# Altium PCB OmniCore_SDR.PcbDoc (part 6 of 14)
Units mil, origin at the board's own origin, x right, y up, seen from the top; angles counter-clockwise.
Board outline 4724.72 x 2755.91 mil, 8 copper layers (Top, GND 1, Layer 1, Layer 2, GND 2, Layer 3, Power, Bottom), stack 40.468 mil thick; 534 components, 427 nets, 2325 pads, 1892 vias.
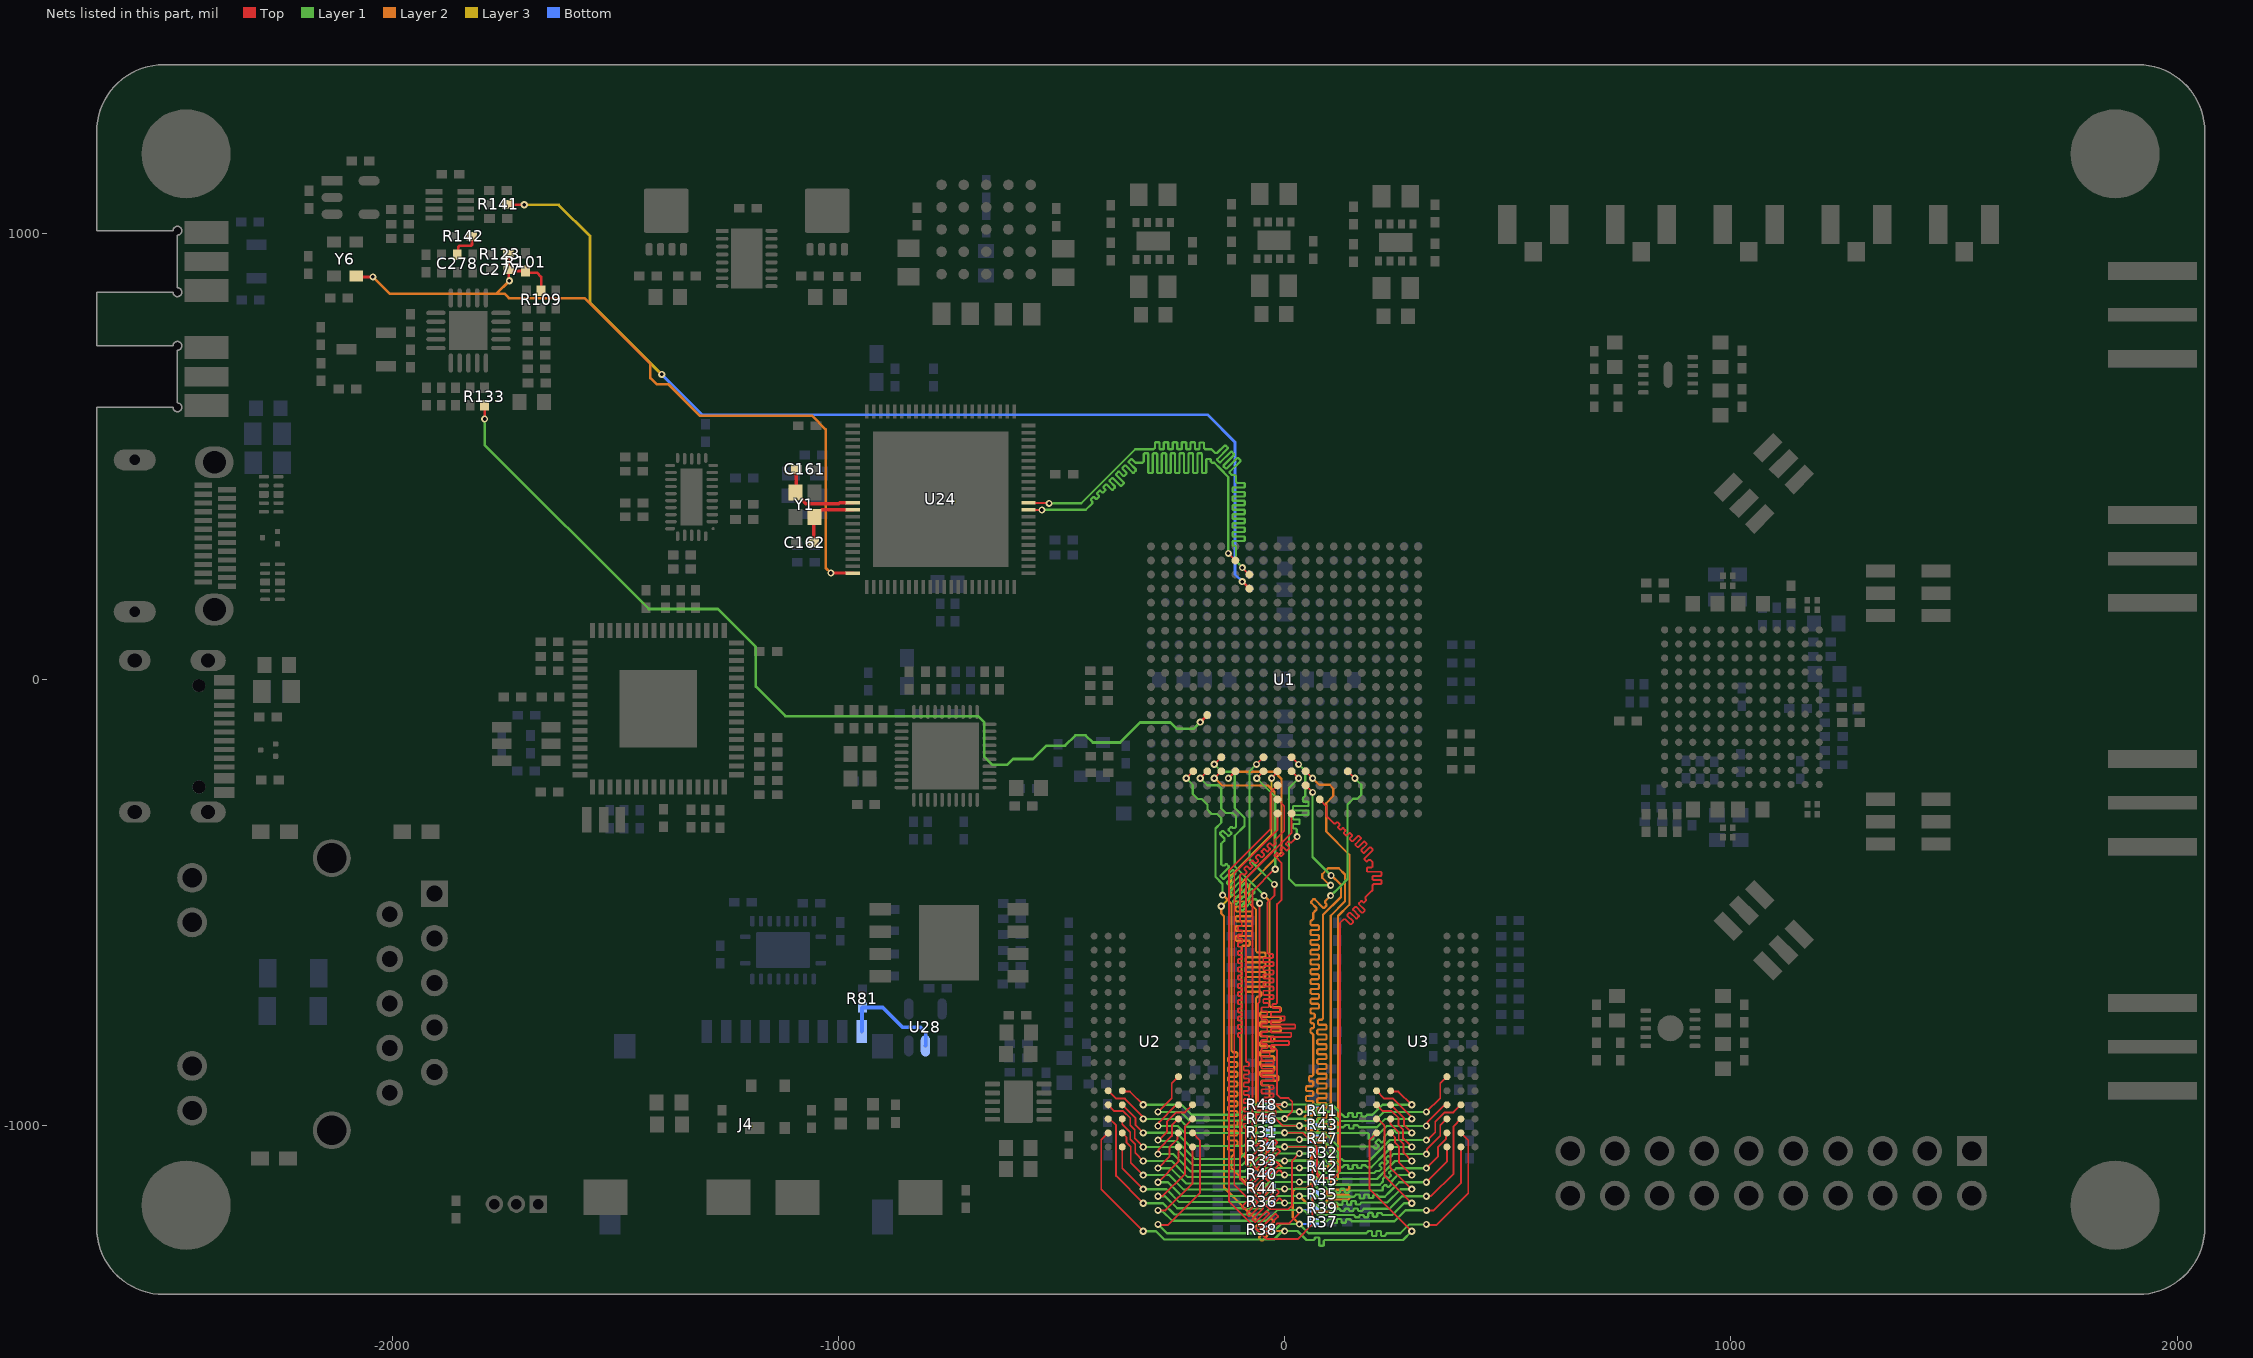
[diagram p11: the nets of this part, all layers, seen from the top]

## Via types
v1: diameter 16, hole 8, Top to Bottom, tented both sides, 1844 vias
v2: diameter 19.68, hole 7.87, Top to Bottom, 44 vias
v3: diameter 200, hole 125, Top to Bottom, 4 vias

## Nets (pads, with @x,y where several pads share a name; then routed paths per layer and width w, separated by ;. In a path a pad name is that pad's centre, name@x,y a point inside that pad or via, vN(x,y) a via of type N, cw(c..) or ccw(c..) an arc to the next point about the centre after c; other vN are vias at no path point) (continued)
ADF4001_LE: R133.1 U1.E8 | length 2173.8
  Top w6: R133.1@-1793.35,614.66 -1793,614.32 v1(-1793,584) ; v1(-189.22,-95.28) U1.E8@-173.47,-79.53
  Layer 1 w6: v1(-1793,584) -1793,526 -1425,158 -1270,158 -1185,73 -1185,-16 -1119,-82 -687,-82 -673,-96 -673,-173 -655,-191 -622,-191 -609,-178 -564,-178 -534,-148 -492,-148 -469,-125 -446,-125 -430,-141 -368.85,-141 -323.85,-96 -256,-96 -241.72,-110.28 -204.22,-110.28 v1(-189.22,-95.28)
ADF4001_PLL_REF: C278.1 R142.2 | length 70.1
  Top w6: C278.1@-1854.35,952.03 -1852,954.38 -1852,969.54 -1849.54,972 -1823.81,972 -1821.35,974.46 R142.2@-1821.35,993.35
BOOT: J4.9 R81.1 U28.2 | length 249.6
  Bottom w8: J4.9@-948.22,-788.58 -947.21,-787.56 -947.21,-735.8 R81.1@-946.2,-734.78 -900.64,-734.78 -855.92,-779.5 -816.2,-779.5 -804.5,-791.2 -804.5,-820.3 U28.2@-805.1,-820.9
CH32H417_RX: U1.H18 U24.55 | length 1508.3
  Top w4.2: U24.55@-574.2,396.1 -573.65,395.55 -528.55,395.55 v1(-528,395) ; v1(-94.73,251.07) v1(-94.73,251.07) U1.H18@-78.98,235.43 U1.H18@-78.98,235.43
  Layer 1 w5: v1(-528,395) -456,395 -335,516 -296.22,516 -293.72,516 -290.79,518.93 -290.79,530.5 -289.29,532 -282.29,532 -280.79,530.5 -280.79,517.5 -279.29,516 -272.29,516 -270.79,517.5 -270.79,530.5 -269.29,532 -262.29,532 -260.79,530.5 -260.79,517.5 -259.29,516 -252.29,516 -250.79,517.5 -250.79,530.5 -249.29,532 -242.29,532 -240.79,530.5 -240.79,517.5 -239.29,516 -232.29,516 -230.79,517.5 -230.79,530.5 -229.29,532 -222.29,532 -220.79,530.5 -220.79,517.5 -219.29,516 -212.29,516 -210.79,517.5 -210.79,530.5 -209.29,532 -202.29,532 -200.79,530.5 -200.79,517.5 -199.29,516 -192.29,516 -190.79,517.5 -190.79,530.05 -189.29,531.55 -182.29,531.55 -180.79,530.05 -180.79,518.93 -177.87,516 -172,516 -164,516 -157.5,509.5 -155.73,507.73 -151.59,507.73 -134.59,524.74 -132.46,524.74 -127.51,519.79 -127.51,517.67 -151.17,494.01 -151.17,491.89 -146.22,486.94 -144.09,486.94 -120.44,510.59 -118.32,510.59 -113.37,505.64 -113.37,503.52 -137.02,479.87 -137.02,477.75 -132.07,472.8 -129.95,472.8 -106.3,496.45 -104.18,496.45 -99.23,491.5 -99.23,489.38 -122.88,465.73 -122.88,463.61 -117.93,458.66 -112.16,458.66 -109.23,455.73 -109.23,449.81 -109.23,446 -109.23,443.5 -106.3,440.57 -90.73,440.57 -89.23,439.07 -89.23,432.07 -90.73,430.57 -115.73,430.57 -117.23,429.07 -117.23,422.07 -115.73,420.57 -90.73,420.57 -89.23,419.07 -89.23,412.07 -90.73,410.57 -115.73,410.57 -117.23,409.07 -117.23,402.07 -115.73,400.57 -90.73,400.57 -89.23,399.07 -89.23,392.07 -90.73,390.57 -115.73,390.57 -117.23,389.07 -117.23,382.07 -115.73,380.57 -90.73,380.57 -89.23,379.07 -89.23,372.07 -90.73,370.57 -115.73,370.57 -117.23,369.07 -117.23,362.07 -115.73,360.57 -90.73,360.57 -89.23,359.07 -89.23,352.07 -90.73,350.57 -115.73,350.57 -117.23,349.07 -117.23,342.07 -115.73,340.57 -90.73,340.57 -89.23,339.07 -89.23,332.07 -90.73,330.57 -115.73,330.57 -117.23,329.07 -117.23,322.07 -115.73,320.57 -90.73,320.57 -89.23,319.07 -89.23,312.07 -90.73,310.57 -115.73,310.57 -117.23,309.07 -117.23,302.07 -115.73,300.57 -112.16,300.57 -109.23,297.64 -109.23,291 -109.23,265.68 -94.73,251.18 v1(-94.73,251.07)
CH32H417_TX: U1.G19 U24.54 | length 1508.1
  Top w4.2: U24.54@-574.2,380.4 -574,380.2 -544.2,380.2 v1(-544,380) ; v1(-126.23,282.68) U1.G19@-110.48,266.93
  Layer 1 w5: v1(-544,380) -543.5,380.5 -445.5,380.5 -433,393 -431.23,394.77 -431.23,398.91 -434.24,401.91 -434.24,404.04 -429.29,408.99 -427.17,408.99 -422.99,404.81 -420.87,404.81 -415.92,409.76 -415.92,411.88 -420.09,416.06 -420.09,418.18 -415.14,423.13 -413.02,423.13 -408.97,419.07 -406.85,419.07 -401.9,424.02 -401.9,426.14 -405.95,430.2 -405.95,432.32 -401,437.27 -398.88,437.27 -387.23,425.62 -385.11,425.62 -380.16,430.57 -380.16,432.69 -391.81,444.34 -391.81,446.46 -386.86,451.41 -384.74,451.41 -367.7,434.38 -365.58,434.38 -360.63,439.32 -360.63,441.45 -377.67,458.48 -377.67,460.6 -372.72,465.55 -370.6,465.55 -361.48,456.44 -359.36,456.44 -354.41,461.39 -354.41,463.51 -363.53,472.62 -363.53,474.75 -358.58,479.7 -356.45,479.7 -340.39,463.63 -338.27,463.63 -333.32,468.58 -333.32,470.7 -349.38,486.77 -349.38,488.89 -344.43,493.84 -342.31,493.84 -334.47,486 -330.86,486 -321,486 -318.5,486 -315.57,488.93 -315.57,505.5 -314.07,507 -307.07,507 -305.57,505.5 -305.57,464.5 -304.07,463 -297.07,463 -295.57,464.5 -295.57,505.5 -294.07,507 -287.07,507 -285.57,505.5 -285.57,464.5 -284.07,463 -277.07,463 -275.57,464.5 -275.57,505.5 -274.07,507 -267.07,507 -265.57,505.5 -265.57,464.5 -264.07,463 -257.07,463 -255.57,464.5 -255.57,505.5 -254.07,507 -247.07,507 -245.57,505.5 -245.57,464.5 -244.07,463 -237.07,463 -235.57,464.5 -235.57,505.5 -234.07,507 -227.07,507 -225.57,505.5 -225.57,464.5 -224.07,463 -217.07,463 -215.57,464.5 -215.57,505.5 -214.07,507 -207.07,507 -205.57,505.5 -205.57,464.5 -204.07,463 -197.07,463 -195.57,464.5 -195.57,505.5 -194.07,507 -187.07,507 -185.57,505.5 -185.57,464.5 -184.07,463 -177.07,463 -175.57,464.5 -175.57,492.59 -174.07,494.09 -167.07,494.09 -165.57,492.59 -165.57,488.93 -162.64,486 -158,486 -144,472 -126.23,454.23 v1(-126.23,282.68)
CH32H417_XI: C161.1 U24.12 Y1.3 | length 193.7
  Top w8: Y1.3@-1096.65,417.59 -1072.9,393.84 -999.16,393.84 -996.9,396.1 U24.12@-967.9,396.1 ; Y1.3@-1094.68,419.56 C161.1@-1094.68,471
  Top w10: Y1.3@-1096.65,417.59 Y1.3@-1094.68,419.56
CH32H417_XO: C162.1 U24.13 Y1.1 | length 151.5
  Top w8: C162.1@-1055.32,307 -1055.32,362.47 Y1.1@-1053.35,364.44 -1053.35,366.41 -1041.6,378.16 -1039.63,378.16 -1037.39,380.4 U24.13@-967.9,380.4
CLK_FB_FPGA: R141.1 U1.H17 | length 2281.2
  Top w4.2: v1(-94.98,219.68) v1@-94.86,219.68 ; U1.H17@-79.11,203.94 U1.H17@-78.98,203.94
  Top w6: R141.1@-1742.66,1065.35 -1741.32,1064 v1(-1704,1064) ; v1@-94.86,219.68 U1.H17@-79.11,203.94
  Layer 3 w6: v1(-1704,1064) -1626.9,1064 -1556.6,993.7 -1556.6,844.6 v1(-1396,684)
  Bottom w6: v1(-1396,684) -1305.6,593.6 -172.98,593.6 -111.23,531.85 -111.23,235.93 v1(-94.98,219.68)
DAC_OUT: C277.2 R101.2 R109.1 R123.1 U24.22 Y6.1 | length 1799.6
  Top w4.2: Y6.1@-2080.35,904.55 Y6.1@-2078.13,902.33
  Top w6: Y6.1@-2078.13,902.33 v1(-2043.17,902.33) ; R123.1@-1739.66,953.35 -1738.66,952.35 C277.2@-1738.66,918.35 ; v1(-1737.57,893.79) -1738.66,894.89 C277.2@-1738.66,918.35 ; R109.1@-1666.35,871.03 -1666.35,902.35 -1676,912 -1697.68,912 R101.2@-1701.35,915.66 -1735.98,915.66 C277.2@-1738.66,918.35 ; v1(-1017,238.84) -1016.88,238.72 -968.02,238.72 U24.22@-967.9,238.6
  Layer 2 w6: v1(-2043.17,902.33) -2005.84,865 -1766.36,865 ; v1(-1737.57,893.79) -1766.36,865 ; v1(-1017,238.84) -1028.8,250.64 -1028.8,560.76 -1059.64,591.6 -1311.1,591.6 -1381.4,661.9 -1407.5,661.9 -1421.5,675.9 -1421.5,707.1 -1569.28,854.88 -1738.29,854.88 -1748.41,865 -1766.36,865
DDR3_A0: R31.2 U1.N2 U2.N3 U3.N3 | length 2389.3
  Top w4.2: U2.N3@-363.98,-952.95 -334,-982.93 -334,-998.8 v1(-316.85,-1015.94) ; v1(0,-1015.48) 40.48,-1015.48 72.5,-1047.5 72.5,-1109.5 80,-1117 109,-1117 124,-1102 124,-545 131.99,-537.01 135.47,-537.01 146.9,-548.44 148.85,-548.44 153.4,-543.88 153.4,-541.93 140.51,-529.04 140.51,-527.09 145.06,-522.53 147.02,-522.53 159.91,-535.43 161.86,-535.43 166.41,-530.87 166.41,-528.92 153.52,-516.03 153.52,-514.08 158.07,-509.52 160.03,-509.52 172.92,-522.41 174.87,-522.41 179.42,-517.86 179.42,-515.91 166.53,-503.02 166.53,-501.07 171.09,-496.51 173.04,-496.51 175.94,-499.41 177.89,-499.41 182.44,-494.86 182.44,-492.91 181.01,-491.47 181.01,-487.99 195.38,-473.62 197,-472 197,-460.7 199.46,-458.24 215.62,-458.24 217,-456.86 217,-450.42 215.62,-449.04 198.38,-449.04 197,-447.66 197,-441.22 198.38,-439.84 215.62,-439.84 217,-438.46 217,-432.02 215.62,-430.64 185.58,-430.64 184.2,-429.26 184.2,-422.82 185.58,-421.44 194.54,-421.44 197,-418.98 197,-409 196,-408 192.03,-404.03 188.55,-404.03 185.06,-407.52 183.11,-407.52 178.56,-402.96 178.56,-401.01 196.95,-382.62 196.95,-380.67 192.4,-376.11 190.45,-376.11 178.25,-388.3 176.3,-388.3 171.75,-383.75 171.75,-381.8 183.94,-369.61 183.94,-367.66 179.39,-363.1 177.43,-363.1 165.24,-375.29 163.29,-375.29 158.74,-370.74 158.74,-368.79 170.93,-356.6 170.93,-354.64 166.38,-350.09 164.42,-350.09 152.23,-362.28 150.28,-362.28 145.73,-357.73 145.73,-355.78 151.07,-350.43 151.07,-348.48 146.52,-343.93 144.57,-343.93 139.22,-349.27 137.27,-349.27 132.72,-344.72 132.72,-342.76 136.21,-339.27 136.21,-337.32 131.66,-332.76 129.71,-332.76 126.21,-336.26 124.26,-336.26 119.71,-331.71 119.71,-329.75 123.2,-326.26 123.2,-324.3 118.65,-319.75 116.7,-319.75 113.96,-322.49 110.49,-322.49 109,-321 93.45,-305.45 93.45,-283.46 U1.N2@78.5,-268.5 ; U3.N3@237.51,-952.95 267.5,-982.93 267.5,-998.8 v1(284.64,-1015.94)
  Layer 1 w5: v1(-316.85,-1015.94) -316.39,-1015.48 -242.52,-1015.48 -213,-1045 -92,-1045 -62.48,-1015.48 v1(0,-1015.48) 0.23,-1015.71 89.71,-1015.71 120.19,-1046.19 132,-1046.19 170.19,-1046.19 197.87,-1046.19 202.41,-1050.74 204.54,-1050.74 209.49,-1045.79 209.49,-1043.67 204.24,-1038.42 204.24,-1036.3 209.19,-1031.35 211.31,-1031.35 216.56,-1036.59 218.68,-1036.59 223.63,-1031.64 223.63,-1029.52 223.12,-1029.02 223.12,-1024.88 229,-1019 232.29,-1015.71 234.79,-1015.71 237.72,-1012.78 237.72,-1011.25 239.22,-1009.75 246.22,-1009.75 247.72,-1011.25 247.72,-1012.78 250.65,-1015.71 256.36,-1015.71 284.41,-1015.71 v1(284.64,-1015.94)
  Bottom w4.2: R31.2@-32,-1014.83 -31.35,-1015.48 v1(0,-1015.48)
DDR3_A1: R32.2 U1.K2 U2.P7 U3.P7 | length 2411.2
  Top w4.2: v1(-283.85,-1063.42) -282.72,-1062.29 -282.72,-1052.72 -252.8,-1022.8 -252.8,-999.25 U2.P7@-238,-984.45 ; U1.K2@-15.99,-268.5 -1.03,-283.46 -1.03,-339.03 -8,-346 -22.19,-360.19 -22.19,-363.67 -20.2,-365.65 -20.2,-367.61 -24.76,-372.16 -26.71,-372.16 -32.16,-366.71 -34.11,-366.71 -38.67,-371.26 -38.67,-373.21 -33.21,-378.67 -33.21,-380.62 -37.77,-385.17 -39.72,-385.17 -45.17,-379.72 -47.12,-379.72 -51.68,-384.27 -51.68,-386.22 -46.22,-391.68 -46.22,-393.63 -50.78,-398.18 -52.73,-398.18 -58.18,-392.73 -60.13,-392.73 -64.69,-397.28 -64.69,-399.23 -59.24,-404.69 -59.24,-406.64 -63.79,-411.19 -65.74,-411.19 -71.19,-405.74 -73.14,-405.74 -77.7,-410.29 -77.7,-412.25 -72.25,-417.7 -72.25,-419.65 -76.8,-424.2 -78.75,-424.2 -84.2,-418.75 -86.15,-418.75 -90.71,-423.3 -90.71,-425.26 -85.26,-430.71 -85.26,-432.66 -89.81,-437.21 -91.76,-437.21 -93.75,-435.23 -97.23,-435.23 -100,-438 -100,-497 -100,-505 -100,-541.13 -97.54,-543.59 -96.16,-544.97 -96.16,-551.41 -97.54,-552.79 -102.82,-552.79 -104.2,-554.17 -104.2,-560.61 -102.82,-561.99 -96.58,-561.99 -95.2,-563.37 -95.2,-569.81 -96.58,-571.19 -103.42,-571.19 -104.8,-572.57 -104.8,-579.01 -103.42,-580.39 -96.58,-580.39 -95.2,-581.77 -95.2,-588.21 -96.58,-589.59 -103.42,-589.59 -104.8,-590.97 -104.8,-597.41 -103.42,-598.79 -96.58,-598.79 -95.2,-600.17 -95.2,-606.61 -96.58,-607.99 -103.42,-607.99 -104.8,-609.37 -104.8,-615.81 -103.42,-617.19 -96.58,-617.19 -95.2,-618.57 -95.2,-625.01 -96.58,-626.39 -103.42,-626.39 -104.8,-627.77 -104.8,-634.21 -103.42,-635.59 -96.58,-635.59 -95.2,-636.97 -95.2,-643.41 -96.58,-644.79 -103.42,-644.79 -104.8,-646.17 -104.8,-652.61 -103.42,-653.99 -96.58,-653.99 -95.2,-655.37 -95.2,-661.81 -96.58,-663.19 -103.42,-663.19 -104.8,-664.57 -104.8,-671.01 -103.42,-672.39 -96.58,-672.39 -95.2,-673.77 -95.2,-680.21 -96.58,-681.59 -103.42,-681.59 -104.8,-682.97 -104.8,-689.41 -103.42,-690.79 -96.58,-690.79 -95.2,-692.17 -95.2,-698.61 -96.58,-699.99 -103.42,-699.99 -104.8,-701.37 -104.8,-707.81 -103.42,-709.19 -96.58,-709.19 -95.2,-710.57 -95.2,-717.01 -96.58,-718.39 -103.42,-718.39 -104.8,-719.77 -104.8,-726.21 -103.42,-727.59 -96.58,-727.59 -95.2,-728.97 -95.2,-735.41 -96.58,-736.79 -103.42,-736.79 -104.8,-738.17 -104.8,-744.61 -103.42,-745.99 -96.58,-745.99 -95.2,-747.37 -95.2,-753.81 -96.58,-755.19 -103.42,-755.19 -104.8,-756.57 -104.8,-763.01 -103.42,-764.39 -96.58,-764.39 -95.2,-765.77 -95.2,-772.21 -96.58,-773.59 -103.42,-773.59 -104.8,-774.97 -104.8,-781.41 -103.42,-782.79 -96.58,-782.79 -95.2,-784.17 -95.2,-790.61 -96.58,-791.99 -103.42,-791.99 -104.8,-793.37 -104.8,-799.81 -103.42,-801.19 -102.46,-801.19 -100,-803.65 -100,-805.75 -100,-1120 -32.94,-1187.06 7.94,-1187.06 16.5,-1178.5 16.5,-1078.5 v1(33,-1062) ; v1(317.64,-1063.42) 318.77,-1062.29 318.77,-1052.72 348.7,-1022.8 348.7,-999.25 U3.P7@363.5,-984.45
  Layer 1 w5: v1(-283.85,-1063.42) -249.58,-1063.42 -211,-1102 -89,-1102 -49,-1062 v1(33,-1062) 76,-1062 120,-1106 187.5,-1106 201,-1106 206.02,-1100.98 210.16,-1100.98 212.29,-1100.99 217.24,-1096.04 217.24,-1093.92 212.58,-1089.26 212.58,-1087.14 217.53,-1082.19 219.66,-1082.19 224.31,-1086.84 226.43,-1086.84 231.38,-1081.89 231.38,-1079.77 226.73,-1075.12 226.73,-1073 231.68,-1068.05 233.8,-1068.05 234.3,-1068.56 238.44,-1068.56 243.58,-1063.42 265.42,-1063.42 v1(317.64,-1063.42)
  Bottom w4.2: v1(33,-1062) 63.09,-1062 R32.2@65,-1060.09
DDR3_A2: R33.2 U1.M3 U2.P3 U3.P3 | length 2417.4
  Top w4.2: U2.P3@-363.98,-984.45 -363.98,-996.19 -346,-1014.18 -346,-1030.39 -335,-1041.39 -335,-1060.79 v1(-316.85,-1078.93) ; U1.M3@47,-237.01 47,-237.13 62.5,-252.63 v1(62.5,-252.76) ; U3.P3@237.51,-984.45 237.51,-996.19 255.5,-1014.18 255.5,-1030.39 266.5,-1041.39 266.5,-1060.79 v1(284.64,-1078.93)
  Layer 1 w5: v1(-316.85,-1078.93) -253.07,-1078.93 -217,-1115 -83,-1115 -46.47,-1078.47 v1(0,-1078.47) 72.47,-1078.47 79,-1085 80.77,-1086.77 84.91,-1086.77 85.41,-1086.26 87.54,-1086.26 92.49,-1091.21 92.49,-1093.33 87.33,-1098.49 87.33,-1100.61 92.28,-1105.56 94.41,-1105.56 99.56,-1100.41 101.68,-1100.41 106.63,-1105.36 106.63,-1107.48 102.01,-1112.09 102.01,-1114.21 106.96,-1119.16 109.09,-1119.16 109.25,-1119 134,-1119 207,-1119 247.07,-1078.93 v1(284.64,-1078.93) ; v1(62.5,-252.76) 62.5,-397.5 v1(104,-439)
  Layer 2 w5: v1(0,-1078.47) 52.53,-1078.47 62,-1069 65.31,-1065.69 65.31,-1061.54 61,-1057.23 61,-1050.63 63.2,-1048.43 91.8,-1048.43 94,-1046.23 94,-1039.63 91.8,-1037.43 68.04,-1037.43 65.84,-1035.23 65.84,-1028.63 68.04,-1026.43 91.8,-1026.43 94,-1024.23 94,-1017.63 91.8,-1015.43 75.2,-1015.43 73,-1013.23 73,-1006.63 75.2,-1004.43 91.8,-1004.43 94,-1002.23 94,-995.63 91.8,-993.43 75.2,-993.43 73,-991.23 73,-984.63 75.2,-982.43 91.8,-982.43 94,-980.23 94,-973.63 91.8,-971.43 75.2,-971.43 73,-969.23 73,-962.63 75.2,-960.43 91.8,-960.43 94,-958.23 94,-951.63 91.8,-949.43 75.2,-949.43 73,-947.23 73,-940.63 75.2,-938.43 91.8,-938.43 94,-936.23 94,-929.63 91.8,-927.43 75.2,-927.43 73,-925.23 73,-918.63 75.2,-916.43 91.8,-916.43 94,-914.23 94,-907.63 91.8,-905.43 75.2,-905.43 73,-903.23 73,-896.63 75.2,-894.43 91.8,-894.43 94,-892.23 94,-885.63 91.8,-883.43 75.2,-883.43 73,-881.23 73,-874.63 75.2,-872.43 91.8,-872.43 94,-870.23 94,-863.63 91.8,-861.43 75.2,-861.43 73,-859.23 73,-852.63 75.2,-850.43 91.8,-850.43 94,-848.23 94,-841.63 91.8,-839.43 75.2,-839.43 73,-837.23 73,-830.63 75.2,-828.43 91.8,-828.43 94,-826.23 94,-819.63 91.8,-817.43 75.2,-817.43 73,-815.23 73,-808.63 75.2,-806.43 91.8,-806.43 94,-804.23 94,-797.63 91.8,-795.43 75.2,-795.43 73,-793.23 73,-786.63 75.2,-784.43 91.8,-784.43 94,-782.23 94,-775.63 91.8,-773.43 77.02,-773.43 74.82,-771.23 74.82,-764.63 77.02,-762.43 83.07,-762.43 86,-759.5 86,-537 86,-527 126,-487 126,-460 105,-439 v1(104,-439)
  Bottom w4.2: R33.2@-32,-1077.17 -30.7,-1078.47 v1(0,-1078.47)
DDR3_A3: R34.2 U1.K3 U2.N2 U3.N2 | length 2453.7
  Top w4.2: U2.N2@-395.48,-952.95 -381.52,-966.91 -361.77,-966.91 -346.2,-982.48 -346.2,-998.69 -336,-1008.89 -336,-1028.29 v1(-316.85,-1047.44) ; U1.K3@-15.99,-237.01 -32,-253.02 -32,-335 -125,-428 -125,-1169 -40,-1254 29,-1254 62,-1221 62,-1058.08 50.82,-1046.9 21.68,-1046.9 21.61,-1046.98 v1(0,-1046.98) ; U3.N2@206.02,-952.95 219.98,-966.91 239.73,-966.91 255.3,-982.48 255.3,-998.69 265.5,-1008.89 265.5,-1028.29 v1(284.64,-1047.44)
  Layer 1 w5: v1(-316.85,-1047.44) -246.56,-1047.44 -206,-1088 -95,-1088 -53.98,-1046.98 v1(0,-1046.98) 80.98,-1046.98 127,-1093 129.5,-1093 132.43,-1090.07 132.43,-1089.5 133.93,-1088 140.93,-1088 142.43,-1089.5 142.43,-1095.5 143.93,-1097 150.93,-1097 152.43,-1095.5 152.43,-1089.5 153.93,-1088 160.93,-1088 162.43,-1089.5 162.43,-1093.29 163.93,-1094.79 170.93,-1094.79 172.43,-1093.29 172.43,-1090.07 173.93,-1088.57 180.93,-1088.57 182.43,-1090.07 185.36,-1093 194,-1093 227.03,-1059.97 239.56,-1047.44 v1(284.64,-1047.44)
  Bottom w4.2: R34.2@-32,-1046 -31.02,-1046.98 v1(0,-1046.98)
DDR3_A4: R35.2 U1.M4 U2.P8 U3.P8 | length 2510.2
  Top w4.2: v1(-283.85,-1157.9) -282.92,-1156.97 -272.97,-1156.97 -223,-1107 -223,-1000.94 U2.P8@-206.5,-984.45 ; U1.M4@47,-205.51 47,-205.64 62.5,-221.14 v1(62.5,-221.26) ; v1(317.64,-1157.9) 318.58,-1156.97 328.53,-1156.97 378.5,-1107 378.5,-1000.94 U3.P8@394.99,-984.45
  Layer 1 w5: v1(-283.85,-1157.9) -268.1,-1157.9 -241,-1185 -53,-1185 -25.44,-1157.44 v1(33,-1157.44) 51.44,-1157.44 80,-1186 89,-1186 91.5,-1186 94.43,-1183.07 94.43,-1182.5 95.93,-1181 102.93,-1181 104.43,-1182.5 104.43,-1189.5 105.93,-1191 112.93,-1191 114.43,-1189.5 114.43,-1187.5 115.93,-1186 122.93,-1186 124.43,-1187.5 124.43,-1189.5 125.93,-1191 132.93,-1191 134.43,-1189.5 134.43,-1187.5 135.93,-1186 142.93,-1186 144.43,-1187.5 144.43,-1189.5 145.93,-1191 152.93,-1191 154.43,-1189.5 154.43,-1186.93 155.93,-1185.43 162.93,-1185.43 164.43,-1186.93 164.43,-1189.5 165.93,-1191 172.93,-1191 174.43,-1189.5 174.43,-1188.93 177.36,-1186 199,-1186 235,-1186 263.1,-1157.9 v1(317.64,-1157.9)
  Layer 2 w5: v1(33,-1157.44) 68,-1192.44 96.56,-1192.44 108.56,-1192.44 110,-1191 115.17,-1185.83 117.67,-1183.33 117.67,-1179.18 114.75,-1176.26 96.7,-1176.26 94.5,-1174.06 94.5,-1167.46 96.7,-1165.26 142.3,-1165.26 144.5,-1163.06 144.5,-1156.46 142.3,-1154.26 96.7,-1154.26 94.5,-1152.06 94.5,-1145.46 96.7,-1143.26 142.3,-1143.26 144.5,-1141.06 144.5,-1134.46 142.3,-1132.26 105.83,-1132.26 103.63,-1130.06 103.63,-1123.46 105.83,-1121.26 116.57,-1121.26 119.5,-1118.33 119.5,-1088 119.5,-530 145,-504.5 145,-392.49 93,-340.49 93,-277 109,-261 109,-243.93 100.83,-235.76 77,-235.76 v1(62.5,-221.26)
  Bottom w4.2: v1(33,-1157.44) 61.19,-1157.44 R35.2@65,-1153.64
DDR3_A5: R36.2 U1.L1 U2.P2 U3.P2 | length 2527.9
  Top w4.2: U2.P2@-395.48,-984.45 -392.56,-984.45 -377.95,-999.05 -377.95,-1112.33 v1(-316.85,-1173.42) ; v1(0,-1172.96) -8.48,-1164.48 -9.97,-1162.99 -13.44,-1162.99 -28.33,-1177.88 -30.29,-1177.88 -34.84,-1173.33 -34.84,-1171.38 -13.41,-1149.95 -13.41,-1148 -17.96,-1143.44 -19.91,-1143.44 -41.46,-1164.99 -43.41,-1164.99 -47.97,-1160.44 -47.97,-1158.48 -27.32,-1137.84 -27.32,-1135.89 -31.88,-1131.33 -33.83,-1131.33 -54.47,-1151.98 -56.42,-1151.98 -60.98,-1147.43 -60.98,-1145.47 -45.21,-1129.7 -45.21,-1127.75 -49.76,-1123.2 -51.71,-1123.2 -67.48,-1138.97 -69.43,-1138.97 -73.99,-1134.41 -73.99,-1132.46 -58.22,-1116.69 -58.22,-1114.74 -62.77,-1110.19 -64.72,-1110.19 -80.49,-1125.96 -82.45,-1125.96 -87,-1121.4 -87,-1119.45 -71.99,-1104.45 -71.99,-1100.97 -87,-1085.96 -87,-1028 -87,-1009 -87,-1006.9 -89.46,-1004.44 -90.42,-1004.44 -91.8,-1003.06 -91.8,-996.62 -90.42,-995.24 -81.58,-995.24 -80.2,-993.86 -80.2,-987.42 -81.58,-986.04 -90.42,-986.04 -91.8,-984.66 -91.8,-978.22 -90.42,-976.84 -81.58,-976.84 -80.2,-975.46 -80.2,-969.02 -81.58,-967.64 -90.42,-967.64 -91.8,-966.26 -91.8,-959.82 -90.42,-958.44 -81.58,-958.44 -80.2,-957.06 -80.2,-950.62 -81.58,-949.24 -90.42,-949.24 -91.8,-947.86 -91.8,-941.42 -90.42,-940.04 -81.58,-940.04 -80.2,-938.66 -80.2,-932.22 -81.58,-930.84 -90.42,-930.84 -91.8,-929.46 -91.8,-923.02 -90.42,-921.64 -81.58,-921.64 -80.2,-920.26 -80.2,-913.82 -81.58,-912.44 -90.42,-912.44 -91.8,-911.06 -91.8,-904.62 -90.42,-903.24 -81.58,-903.24 -80.2,-901.86 -80.2,-895.42 -81.58,-894.04 -90.42,-894.04 -91.8,-892.66 -91.8,-886.22 -90.42,-884.84 -81.58,-884.84 -80.2,-883.46 -80.2,-877.02 -81.58,-875.64 -90.42,-875.64 -91.8,-874.26 -91.8,-867.82 -90.42,-866.44 -81.65,-866.44 -80.27,-865.06 -80.27,-858.62 -81.65,-857.24 -84.54,-857.24 -87,-854.78 -87,-821 -87,-446 9.5,-349.5 15.5,-343.5 U1.L1@15.5,-300 ; U3.P2@206.02,-984.45 208.94,-984.45 223.55,-999.05 223.55,-1112.33 v1(284.64,-1173.42)
  Layer 1 w5: v1(-316.85,-1173.42) -272.58,-1173.42 -247,-1199 -47,-1199 -20.96,-1172.96 v1(0,-1172.96) 46.96,-1172.96 74,-1200 142,-1200 154.5,-1200 157.43,-1202.93 157.43,-1203.5 158.93,-1205 165.93,-1205 167.43,-1203.5 167.43,-1201.5 168.93,-1200 175.93,-1200 177.43,-1201.5 177.43,-1203.5 178.93,-1205 185.93,-1205 187.43,-1203.5 187.43,-1196.5 188.93,-1195 195.93,-1195 197.43,-1196.5 197.43,-1202.13 198.93,-1203.63 205.93,-1203.63 207.43,-1202.13 207.43,-1197.07 208.93,-1195.57 215.93,-1195.57 217.43,-1197.07 220.36,-1200 241,-1200 267.58,-1173.42 v1(284.64,-1173.42)
  Bottom w4.2: R36.2@-32,-1170.67 -29.71,-1172.96 v1(0,-1172.96)
DDR3_A6: R37.2 U1.L4 U2.R8 U3.R8 | length 2557.4
  Top w4.2: v1(-283.85,-1220.9) -282.75,-1222 -261,-1222 -190,-1151 -190,-1032.45 U2.R8@-206.5,-1015.94 ; U1.L4@15.5,-205.51 v1(31.25,-221.26) ; v1(317.64,-1220.9) 318.75,-1222 340.5,-1222 411.5,-1151 411.5,-1032.45 U3.R8@394.99,-1015.94
  Layer 1 w5: v1(-283.85,-1220.9) -263.75,-1241 -29,-1241 -8,-1220 32.57,-1220 v1(33,-1220.43) 53.57,-1241 101,-1241 180.5,-1241 183,-1241 185.93,-1238.07 185.93,-1237.5 187.43,-1236 194.43,-1236 195.93,-1237.5 195.93,-1245.5 197.43,-1247 204.43,-1247 205.93,-1245.5 205.93,-1237.5 207.43,-1236 214.43,-1236 215.93,-1237.5 215.93,-1245.23 217.43,-1246.73 224.43,-1246.73 225.93,-1245.23 225.93,-1243.93 228.86,-1241 259,-1241 279.1,-1220.9 v1(317.64,-1220.9) ; v1(31.25,-221.26) 9.5,-243.01 9.5,-446.5 24,-461 v1(103,-461)
  Layer 2 w5: v1(33,-1220.43) 18,-1205.43 18,-1148 25,-1141 47,-1141 58,-1130 76,-1112 77.77,-1110.23 77.77,-1106.09 72,-1100.32 72,-1097.21 76.66,-1092.54 79.77,-1092.54 85.55,-1098.31 89.69,-1098.31 95.5,-1092.5 103,-1085 103,-529 135,-497 135,-437 121,-423 97,-423 84,-436 84,-444 101,-461 v1(103,-461)
  Bottom w4.2: v1(33,-1220.43) 60.57,-1220.43 R37.2@65,-1216
DDR3_A7: R38.2 U1.K4 U2.R2 U3.R2 | length 2519.2
  Top w4.2: U2.R2@-395.48,-1015.94 -411,-1031.46 -411,-1142.27 v1(-316.85,-1236.41) ; v1(-29.31,-220.96) -29.31,-219.9 -15.99,-206.57 U1.K4@-15.99,-205.51 ; U3.R2@206.02,-1015.94 190.5,-1031.46 190.5,-1142.27 v1(284.64,-1236.41)
  Layer 1 w5: v1@-316.82,-1236.45 -288.55,-1236.45 -270,-1255 -24,-1255 -7.06,-1238.06 -2.1,-1238.06 v1(0,-1235.95) 28.95,-1235.95 49,-1256 62,-1256 64.5,-1256 67.43,-1253.07 67.43,-1251.5 68.93,-1250 75.93,-1250 77.43,-1251.5 77.43,-1267.52 78.93,-1269.02 85.93,-1269.02 87.43,-1267.52 87.43,-1258.93 90.36,-1256 108.07,-1256 265.06,-1256 v1(284.64,-1236.41)
  Layer 2 w5: v1(-142,-508) -142,-523.98 -135.76,-530.22 -135.76,-1138.24 -89.5,-1184.5 -87.73,-1186.27 -58.83,-1215.17 -58.83,-1219.31 -66.05,-1226.53 -66.05,-1228.86 -60.6,-1234.31 -58.27,-1234.31 -32.47,-1208.51 -30.14,-1208.51 -24.69,-1213.95 -24.69,-1216.28 -57.72,-1249.31 -57.72,-1251.64 -52.27,-1257.08 -49.94,-1257.08 -28.8,-1235.95 -25.27,-1235.95 v1(0,-1235.95)
  Layer 3 w5: v1(-142,-508) -119.5,-485.5 -119.5,-438.5 -29.31,-348.31 v1(-29.31,-220.96)
  Bottom w4.2: R38.2@-32,-1233 -29.05,-1235.95 v1(0,-1235.95)
DDR3_A8: R39.2 U1.K1 U2.T8 U3.T8 | length 2486.6
  Top w4.2: v1(-283.85,-1189.4) -267.4,-1189.4 -206.5,-1128.5 U2.T8@-206.5,-1047.44 ; U1.K1@-15.99,-300 -15.99,-336.99 -113,-434 -113,-1132 -104.75,-1140.25 -81.77,-1163.23 -81.77,-1166.71 -95.54,-1180.47 -95.54,-1182.42 -90.98,-1186.97 -89.03,-1186.97 -67.8,-1165.75 -65.85,-1165.75 -61.3,-1170.3 -61.3,-1172.25 -84.75,-1195.7 -84.75,-1197.65 -80.2,-1202.21 -78.24,-1202.21 -54.79,-1178.76 -52.84,-1178.76 -48.29,-1183.31 -48.29,-1185.26 -71.74,-1208.71 -71.74,-1210.67 -67.18,-1215.22 -65.23,-1215.22 -41.78,-1191.77 -39.83,-1191.77 -35.28,-1196.32 -35.28,-1198.27 -58.73,-1221.72 -58.73,-1223.68 -54.17,-1228.23 -52.22,-1228.23 -21.58,-1197.59 -19.63,-1197.59 -15.08,-1202.14 -15.08,-1204.09 -45.72,-1234.74 -45.72,-1236.69 -41.16,-1241.24 -39.21,-1241.24 -16.53,-1218.56 -13.56,-1218.56 10.44,-1218.56 30.74,-1198.26 30.74,-1191.2 v1(33,-1188.94) ; v1(317.64,-1189.4) 334.1,-1189.4 394.99,-1128.5 U3.T8@394.99,-1047.44
  Layer 1 w5: v1(-283.85,-1189.4) -282.02,-1191.23 -273.77,-1191.23 -252,-1213 -41,-1213 -16.94,-1188.94 v1(33,-1188.94) 33.99,-1189.93 43.93,-1189.93 68,-1214 92,-1214 94.5,-1214 97.43,-1211.07 97.43,-1210.5 98.93,-1209 105.93,-1209 107.43,-1210.5 107.43,-1216.5 108.93,-1218 115.93,-1218 117.43,-1216.5 117.43,-1210.5 118.93,-1209 125.93,-1209 127.43,-1210.5 127.43,-1215.65 128.93,-1217.15 135.93,-1217.15 137.43,-1215.65 137.43,-1211.07 138.93,-1209.57 145.93,-1209.57 147.43,-1211.07 150.36,-1214 161,-1214 246,-1214 270.6,-1189.4 v1(317.64,-1189.4)
  Bottom w4.2: v1(33,-1188.94) 60.88,-1188.94 R39.2@65,-1184.82
DDR3_A9: R40.2 U1.J4 U2.R3 U3.R3 | length 2405.6
  Top w4.2: U2.R3@-363.98,-1015.94 -363.98,-1016.41 -354.2,-1026.19 -354.2,-1037.47 -345,-1046.67 -345,-1082.28 v1(-316.85,-1110.43) ; v1(-62.5,-221) -62.5,-220.76 -47.49,-205.75 U1.J4@-47.49,-205.51 ; v1(-21,-425) -23,-425 -72,-474 -72,-981 -72,-1037.97 -65.49,-1044.48 -62.01,-1044.48 -44.6,-1027.07 -42.65,-1027.07 -38.1,-1031.62 -38.1,-1033.57 -77.82,-1073.3 -77.82,-1075.25 -73.27,-1079.8 -71.32,-1079.8 -23.43,-1031.92 -21.48,-1031.92 -16.93,-1036.47 -16.93,-1038.42 -68.96,-1090.45 -68.96,-1092.41 -64.4,-1096.96 -62.45,-1096.96 -17.18,-1051.69 -15.23,-1051.69 -10.68,-1056.24 -10.68,-1058.19 -55.95,-1103.46 -55.95,-1105.42 -51.39,-1109.97 -49.44,-1109.97 -19.92,-1080.45 -17.97,-1080.45 -13.41,-1085 -13.41,-1086.95 -42.94,-1116.48 -42.94,-1118.43 -38.38,-1122.98 -36.43,-1122.98 -13.45,-1100 -9.97,-1100 -8.48,-1101.48 v1(0,-1109.97) ; U3.R3@237.51,-1015.94 237.51,-1016.41 247.3,-1026.19 247.3,-1037.47 256.5,-1046.67 256.5,-1082.28 v1(284.64,-1110.43)
  Layer 1 w5: v1(-316.85,-1110.43) -258.57,-1110.43 -226,-1143 -71,-1143 -37.97,-1109.97 v1(0,-1109.97) 63.97,-1109.97 95,-1141 99,-1145 111.64,-1145 114.57,-1147.93 114.57,-1148.5 116.07,-1150 123.07,-1150 124.57,-1148.5 124.57,-1142.5 126.07,-1141 133.07,-1141 134.57,-1142.5 134.57,-1148.5 136.07,-1150 143.07,-1150 144.57,-1148.5 144.57,-1147.93 147.5,-1145 203,-1145 217.28,-1145 219,-1145 219.91,-1144.09 219.91,-1139.95 219.91,-1137.82 224.86,-1132.87 226.98,-1132.87 231.13,-1137.02 233.25,-1137.02 238.2,-1132.07 238.2,-1129.95 238.19,-1125.81 248,-1116 253.57,-1110.43 v1(284.64,-1110.43) ; v1(-62.5,-221) -21,-262.51 v1(-21,-425)
  Bottom w4.2: R40.2@-32,-1108.33 -30.37,-1109.97 v1(0,-1109.97)
DDR3_A10: R41.2 U1.F5 U2.L7 U3.L7 | length 2387.8
  Top w4.2: v1(-283.85,-968.93) -253,-938.07 -253,-904.96 U2.L7@-238,-889.96 ; v1(-157.72,-189.76) U1.F5@-141.98,-174.02 ; v1(317.64,-968.93) 348.5,-938.07 348.5,-904.96 U3.L7@363.5,-889.96
  Layer 1 w5: v1(-283.85,-968.93) -233.07,-968.93 -214,-988 -95,-988 -75.47,-968.47 v1(33,-968.47) 55,-968.47 57.5,-968.47 60.43,-965.54 60.43,-962.99 61.93,-961.49 68.93,-961.49 70.43,-962.99 70.43,-973.48 71.93,-974.98 78.93,-974.98 80.43,-973.48 80.43,-963.07 81.93,-961.57 88.93,-961.57 90.43,-963.07 90.43,-965.54 93.36,-968.47 102.47,-968.47 123,-989 202,-989 222.07,-968.93 v1(317.64,-968.93) ; v1(-157.72,-189.76) -140.73,-206.76 -118.24,-206.76 -111.73,-213.27 -111.73,-288 -97.73,-302 -90,-309.73 -90,-328.27 -111.73,-350 -111.73,-418.27 v1(-46,-484)
  Layer 2 w5: v1(-46,-484) -34.03,-495.97 -34.03,-518 -34.03,-728.48 -34.03,-730.98 -31.1,-733.91 -11.23,-733.91 -9.03,-736.11 -9.03,-742.71 -11.23,-744.91 -52.8,-744.91 -55,-747.11 -55,-753.71 -52.8,-755.91 -11.23,-755.91 -9.03,-758.11 -9.03,-764.71 -11.23,-766.91 -52.8,-766.91 -55,-769.11 -55,-775.71 -52.8,-777.91 -11.23,-777.91 -9.03,-780.11 -9.03,-786.71 -11.23,-788.91 -52.8,-788.91 -55,-791.11 -55,-797.71 -52.8,-799.91 -25.56,-799.91 -23.36,-802.11 -23.36,-808.71 -25.56,-810.91 -52.8,-810.91 -55,-813.11 -55,-819.71 -52.8,-821.91 -25.7,-821.91 -23.5,-824.11 -23.5,-830.71 -25.7,-832.91 -52.8,-832.91 -55,-835.11 -55,-841.71 -52.8,-843.91 -25.7,-843.91 -23.5,-846.11 -23.5,-852.71 -25.7,-854.91 -52.8,-854.91 -55,-857.11 -55,-863.71 -52.8,-865.91 -25.7,-865.91 -23.5,-868.11 -23.5,-874.71 -25.7,-876.91 -52.8,-876.91 -55,-879.11 -55,-885.71 -52.8,-887.91 -16.7,-887.91 -14.5,-890.11 -14.5,-896.71 -16.7,-898.91 -50.36,-898.91 -52.56,-901.11 -52.56,-907.71 -50.36,-909.91 -36.96,-909.91 -34.03,-912.84 -34.03,-929 -34.03,-938.96 -4.53,-968.47 v1(33,-968.47)
  Bottom w4.2: v1(33,-968.47) 63.08,-968.47 R41.2@65,-966.55
DDR3_A11: R42.2 U1.G4 U2.R7 U3.R7 | length 2402
  Top w4.2: v1(-283.85,-1094.91) -258.2,-1069.26 -258.2,-1047.89 -240.21,-1029.9 -240.21,-1018.15 U2.R7@-238,-1015.94 ; v1(-126.23,-221.26) U1.G4@-110.48,-205.51 ; v1(317.64,-1094.91) 343.3,-1069.26 343.3,-1047.89 361.29,-1029.9 361.29,-1018.15 U3.R7@363.5,-1015.94
  Layer 1 w5: v1(-283.85,-1094.91) -255.09,-1094.91 -221,-1129 -77,-1129 -42.45,-1094.45 v1(33,-1094.45) 68.45,-1094.45 73.5,-1099.5 75.27,-1101.27 82.34,-1108.34 82.34,-1112.48 81.83,-1112.99 81.83,-1115.11 86.78,-1120.06 88.91,-1120.06 90.96,-1118 93.08,-1118 98.03,-1122.95 98.03,-1125.08 95.98,-1127.13 95.98,-1129.25 100.93,-1134.2 103.05,-1134.2 105.25,-1132 126,-1132 213,-1132 218.5,-1126.5 220.27,-1124.73 220.27,-1120.59 220.26,-1118.46 225.21,-1113.51 227.33,-1113.51 230.9,-1117.08 233.02,-1117.08 237.97,-1112.13 237.97,-1110.01 234.41,-1106.45 234.41,-1104.33 239.36,-1099.38 241.48,-1099.38 245.62,-1099.38 250.09,-1094.91 v1(317.64,-1094.91)
  Layer 2 w5: v1(-126.23,-221.26) -111.43,-206.46 -23.31,-206.46 -7,-222.77 -7,-387 -79.5,-459.5 -79.5,-500.5 -64,-516 -64,-606 -64,-608.5 -61.07,-611.43 -45.23,-611.43 -43.03,-613.63 -43.03,-620.23 -45.23,-622.43 -85.8,-622.43 -88,-624.63 -88,-631.23 -85.8,-633.43 -45.23,-633.43 -43.03,-635.63 -43.03,-642.23 -45.23,-644.43 -85.8,-644.43 -88,-646.63 -88,-653.23 -85.8,-655.43 -45.23,-655.43 -43.03,-657.63 -43.03,-664.23 -45.23,-666.43 -85.8,-666.43 -88,-668.63 -88,-675.23 -85.8,-677.43 -45.23,-677.43 -43.03,-679.63 -43.03,-686.23 -45.23,-688.43 -85.8,-688.43 -88,-690.63 -88,-697.23 -85.8,-699.43 -54.68,-699.43 -52.48,-701.63 -52.48,-708.23 -54.68,-710.43 -61.07,-710.43 -64,-713.36 -64,-728.18 -64,-755.93 -64,-833 -64,-978 -64,-1034.98 -4.53,-1094.45 v1(33,-1094.45)
  Bottom w4.2: v1(33,-1094.45) 61.82,-1094.45 R42.2@65,-1091.27
DDR3_A12: R43.2 U1.E4 U2.N7 U3.N7 | length 2349.8
  Top w4.2: v1(-283.85,-1000.42) -281.6,-998.17 -281.6,-991.6 -245.16,-955.16 -240.21,-955.16 U2.N7@-238,-952.95 ; v1(-189.22,-221.26) U1.E4@-173.47,-205.51 ; v1(-56.2,-501.2) -56.2,-722.26 -60,-726.06 -60,-943.92 -53.56,-950.36 -53.56,-953.84 -56.02,-956.3 -62.42,-956.3 -63.8,-957.68 -63.8,-964.12 -62.42,-965.5 -21.38,-965.5 -20,-966.88 -20,-973.32 -21.38,-974.7 -62.42,-974.7 -63.8,-976.08 -63.8,-982.52 -62.42,-983.9 -20.02,-983.9 -17.92,-986 -3.96,-999.96 v1(33,-999.96) ; v1(317.64,-1000.42) 319.9,-998.17 319.9,-991.6 356.34,-955.16 361.29,-955.16 U3.N7@363.5,-952.95
  Layer 1 w5: v1(-283.85,-1000.42) -239.58,-1000.42 -224,-1016 -83,-1016 -66.96,-999.96 v1(33,-999.96) 53,-999.96 65.5,-999.96 68.43,-1002.89 68.43,-1005.21 69.93,-1006.71 76.93,-1006.71 78.43,-1005.21 78.43,-1002.89 81.36,-999.96 93.96,-999.96 110,-1016 185.5,-1016 188.43,-1018.93 188.43,-1029.38 189.93,-1030.88 196.93,-1030.88 198.43,-1029.38 198.43,-1018.93 201.36,-1016 213,-1016 228.58,-1000.42 232.29,-1000.42 v1(317.64,-1000.42) ; v1(-189.22,-221.26) -173.48,-237 -148,-237 -142,-243 -142,-288.99 -132.23,-298.75 -116.25,-298.75 -109,-306 -109,-322 -109,-329.68 -111.93,-332.61 -116.07,-332.61 -118.27,-330.41 -120.39,-330.41 -125.34,-335.36 -125.34,-337.48 -119.68,-343.14 -119.68,-345.27 -124.63,-350.22 -126.75,-350.22 -137.87,-339.09 -139.99,-339.09 -144.94,-344.04 -144.94,-346.17 -134.85,-356.25 -134.85,-360.4 -138.73,-364.27 -142,-367.54 -142,-371 -142,-413.9 -139.07,-416.83 -134.93,-416.83 -131.84,-413.74 -129.72,-413.74 -124.77,-418.69 -124.77,-420.81 -143.05,-439.1 -143.05,-441.22 -138.1,-446.17 -135.98,-446.17 -117.33,-427.52 -115.21,-427.52 -110.26,-432.47 -110.26,-434.59 -129.54,-453.87 -129.54,-455.99 -124.59,-460.94 -122.47,-460.94 -103.19,-441.66 -101.07,-441.66 -96.12,-446.61 -96.12,-448.73 -123.54,-476.15 -123.54,-478.27 -118.59,-483.22 -116.47,-483.22 -89.05,-455.8 -86.93,-455.8 -81.98,-460.75 -81.98,-462.87 -115.48,-496.37 -115.48,-498.49 -110.53,-503.44 -108.41,-503.44 -74.91,-469.94 -72.78,-469.94 -67.83,-474.89 -67.83,-477.01 -101.34,-510.52 -101.34,-512.64 -96.39,-517.59 -94.26,-517.59 -69.11,-492.43 -64.97,-492.43 -63.2,-494.2 v1(-56.2,-501.2)
  Bottom w4.2: v1(33,-999.96) 62.77,-999.96 R43.2@65,-997.73
DDR3_A13: R44.2 U1.D4 U2.T3 U3.T3 | length 2411.6
  Top w4.2: U2.T3@-363.98,-1047.44 -363.98,-1094.8 v1(-316.85,-1141.93) ; v1(-220.72,-221.26) U1.D4@-204.97,-205.51 ; U3.T3@237.51,-1047.44 237.51,-1094.8 v1(284.64,-1141.93)
  Layer 1 w5: v1(-316.85,-1141.93) -265.07,-1141.93 -236,-1171 -59,-1171 -29.46,-1141.46 v1(0,-1141.46) 55.46,-1141.46 86,-1172 104,-1172 116.5,-1172 119.43,-1174.93 119.43,-1175.5 120.93,-1177 127.93,-1177 129.43,-1175.5 129.43,-1169.5 130.93,-1168 137.93,-1168 139.43,-1169.5 139.43,-1175.5 140.93,-1177 147.93,-1177 149.43,-1175.5 149.43,-1170.06 150.93,-1168.56 157.93,-1168.56 159.43,-1170.06 159.43,-1174.93 160.93,-1176.43 167.93,-1176.43 169.43,-1174.93 172.36,-1172 190,-1172 230,-1172 260.07,-1141.93 v1(284.64,-1141.93) ; v1(-220.72,-221.26) -206,-235.98 -206,-256.48 -195.12,-267.36 -185.88,-267.36 -173,-280.25 -173,-292 -164,-301 -151,-301 -142,-310 -142,-320.53 -155,-333.53 -155,-442 -139.1,-457.9 v1(-139.1,-483)
  Layer 2 w5: v1(-139.1,-483) -138.36,-483 -119,-502.36 -119,-708 -119,-829.5 -119,-832 -116.07,-834.93 -108.2,-834.93 -106,-837.13 -106,-843.73 -108.2,-845.93 -124.56,-845.93 -126.76,-848.13 -126.76,-854.73 -124.56,-856.93 -108.2,-856.93 -106,-859.13 -106,-865.73 -108.2,-867.93 -124.56,-867.93 -126.76,-870.13 -126.76,-876.73 -124.56,-878.93 -108.2,-878.93 -106,-881.13 -106,-887.73 -108.2,-889.93 -124.56,-889.93 -126.76,-892.13 -126.76,-898.73 -124.56,-900.93 -108.2,-900.93 -106,-903.13 -106,-909.73 -108.2,-911.93 -124.56,-911.93 -126.76,-914.13 -126.76,-920.73 -124.56,-922.93 -108.2,-922.93 -106,-925.13 -106,-931.73 -108.2,-933.93 -124.56,-933.93 -126.76,-936.13 -126.76,-942.73 -124.56,-944.93 -108.2,-944.93 -106,-947.13 -106,-953.73 -108.2,-955.93 -124.56,-955.93 -126.76,-958.13 -126.76,-964.73 -124.56,-966.93 -108.2,-966.93 -106,-969.13 -106,-975.73 -108.2,-977.93 -124.56,-977.93 -126.76,-980.13 -126.76,-986.73 -124.56,-988.93 -108.2,-988.93 -106,-991.13 -106,-997.73 -108.2,-999.93 -124.56,-999.93 -126.76,-1002.13 -126.76,-1008.73 -124.56,-1010.93 -108.2,-1010.93 -106,-1013.13 -106,-1019.73 -108.2,-1021.93 -124.56,-1021.93 -126.76,-1024.13 -126.76,-1030.73 -124.56,-1032.93 -108.2,-1032.93 -106,-1035.13 -106,-1041.73 -108.2,-1043.93 -124.48,-1043.93 -126.68,-1046.13 -126.68,-1052.73 -124.48,-1054.93 -116.07,-1054.93 -113.87,-1057.13 -113.87,-1063.73 -116.07,-1065.93 -119,-1068.86 -119,-1086.85 -119,-1095 -72.54,-1141.46 v1(0,-1141.46)
  Bottom w4.2: R44.2@-32,-1139.5 -30.04,-1141.46 v1(0,-1141.46)
DDR3_A14: R45.2 U1.F4 U2.T7 U3.T7 | length 2397.4
  Top w4.2: v1(-283.85,-1126.41) -238,-1080.55 U2.T7@-238,-1047.44 ; v1(-157.72,-221.26) U1.F4@-141.98,-205.51 ; v1(317.64,-1126.41) 363.5,-1080.55 U3.T7@363.5,-1047.44
  Layer 1 w5: v1(-283.85,-1126.41) -261.59,-1126.41 -231,-1157 -65,-1157 -33.95,-1125.95 v1(33,-1125.95) 59.95,-1125.95 93,-1159 133,-1159 155.5,-1159 158.43,-1156.07 158.43,-1155.5 159.93,-1154 166.93,-1154 168.43,-1155.5 168.43,-1161.5 169.93,-1163 176.93,-1163 178.43,-1161.5 178.43,-1155.5 179.93,-1154 186.93,-1154 188.43,-1155.5 188.43,-1160.53 189.93,-1162.03 196.93,-1162.03 198.43,-1160.53 198.43,-1156.07 199.93,-1154.57 206.93,-1154.57 208.43,-1156.07 211.36,-1159 224,-1159 236,-1147 256.59,-1126.41 v1(317.64,-1126.41)
  Layer 2 w5: v1(-157.72,-221.26) -155.99,-221.26 -139.75,-237.5 -37.5,-237.5 -23,-252 -23,-381 -97,-455 -97,-470 -97,-472.5 -94.07,-475.43 -90.7,-475.43 -88.5,-477.63 -88.5,-484.23 -90.7,-486.43 -109.27,-486.43 -111.47,-488.63 -111.47,-495.23 -109.27,-497.43 -90.7,-497.43 -88.5,-499.63 -88.5,-506.23 -90.7,-508.43 -107.8,-508.43 -110,-510.63 -110,-517.23 -107.8,-519.43 -75.5,-519.43 -73.3,-521.63 -73.3,-528.23 -75.5,-530.43 -107.8,-530.43 -110,-532.63 -110,-539.23 -107.8,-541.43 -75.2,-541.43 -73,-543.63 -73,-550.23 -75.2,-552.43 -107.8,-552.43 -110,-554.63 -110,-561.23 -107.8,-563.43 -75.2,-563.43 -73,-565.63 -73,-572.23 -75.2,-574.43 -107.8,-574.43 -110,-576.63 -110,-583.23 -107.8,-585.43 -80.34,-585.43 -78.14,-587.63 -78.14,-594.23 -80.34,-596.43 -94.07,-596.43 -97,-599.36 -97,-637 -97,-786 -97,-1062 -33.05,-1125.95 v1(33,-1125.95)
  Bottom w4.2: v1(33,-1125.95) 61.51,-1125.95 R45.2@65,-1122.45
DDR3_BA0: R46.2 U1.L5 U2.M2 U3.M2 | length 2387.7
  Top w4.2: U2.M2@-395.48,-921.45 -377.95,-938.99 -358.2,-938.99 -319.11,-978.07 -319.11,-982.19 v1(-316.85,-984.45) ; v1(0,-983.98) 17,-966.98 17,-946.46 8.54,-938 -9,-938 -17,-930 -17,-832.75 -17,-830.65 -19.46,-828.19 -29.42,-828.19 -30.8,-826.81 -30.8,-820.37 -29.42,-818.99 8.37,-818.99 9.75,-817.61 9.75,-811.17 8.37,-809.79 -29.42,-809.79 -30.8,-808.41 -30.8,-801.97 -29.42,-800.59 13.48,-800.59 14.86,-799.21 14.86,-792.77 13.48,-791.39 -29.42,-791.39 -30.8,-790.01 -30.8,-783.57 -29.42,-782.19 22.44,-782.19 23.82,-780.81 23.82,-774.37 22.44,-772.99 -29.42,-772.99 -30.8,-771.61 -30.8,-765.17 -29.42,-763.79 -1.46,-763.79 -0.08,-762.41 -0.08,-755.97 -1.46,-754.59 -29.42,-754.59 -30.8,-753.21 -30.8,-746.77 -29.42,-745.39 -11.48,-745.39 -10.1,-744.01 -10.1,-737.57 -11.48,-736.19 -26.15,-736.19 -27.53,-734.81 -27.53,-728.37 -26.15,-726.99 -19.46,-726.99 -17,-724.53 -17,-503 -7,-493 -6.9,-493 -6.9,-414.16 -6.9,-411.19 -22.77,-395.32 -22.77,-393.37 -18.22,-388.81 -16.26,-388.81 -9.33,-395.75 -7.38,-395.75 -2.83,-391.19 -2.83,-389.24 -9.76,-382.31 -9.76,-380.36 -5.21,-375.8 -3.25,-375.8 3.76,-382.82 5.72,-382.82 10.27,-378.27 10.27,-376.31 3.25,-369.3 3.25,-367.34 7.81,-362.79 9.76,-362.79 11.74,-364.78 15.22,-364.78 18,-362 v1(28,-352) ; U1.L5@15.5,-174.02 15.5,-174.13 31.25,-189.88 v1(31.25,-190) ; U3.M2@206.02,-921.45 223.55,-938.99 243.3,-938.99 282.39,-978.07 282.39,-982.19 v1(284.64,-984.45)
  Layer 1 w5: v1(-316.85,-984.45) -236.55,-984.45 -219,-1002 -89,-1002 -70.98,-983.98 v1(0,-983.98) 48.99,-983.98 61.49,-983.98 64.42,-986.91 64.42,-989.46 65.92,-990.96 72.92,-990.96 74.42,-989.46 74.42,-985.48 75.92,-983.98 82.92,-983.98 84.42,-985.48 84.42,-989.46 85.92,-990.96 92.92,-990.96 96.87,-987.01 101.01,-987.01 117,-1003 131.49,-1003 134.42,-1000.07 134.42,-999.5 135.92,-998 142.92,-998 144.42,-999.5 144.42,-1004.76 145.92,-1006.26 152.92,-1006.26 154.42,-1004.76 154.42,-1000.07 155.92,-998.57 162.92,-998.57 164.42,-1000.07 167.35,-1003 183.18,-1003 207,-1003 225.55,-984.45 v1(284.64,-984.45) ; v1(28,-352) 27,-351 27,-339 27,-336.5 24.07,-333.57 19.5,-333.57 18.5,-332.57 18.5,-324.57 19.5,-323.57 32.5,-323.57 33.5,-322.57 33.5,-314.57 32.5,-313.57 19.5,-313.57 18.5,-312.57 18.5,-304.57 19.5,-303.57 52.5,-303.57 53.5,-302.57 53.5,-294.57 52.5,-293.57 19.5,-293.57 18.5,-292.57 18.5,-284.57 19.5,-283.57 52.5,-283.57 53.5,-282.57 53.5,-274.57 52.5,-273.57 41.94,-273.57 40.94,-272.57 40.94,-264.57 41.94,-263.57 43.07,-263.57 46,-260.64 46,-246.5 48.93,-243.57 50.18,-243.57 51.18,-242.57 51.18,-234.57 50.18,-233.57 48.93,-233.57 46,-230.64 46,-219 46,-204.75 v1(31.25,-190)
  Bottom w4.2: R46.2@-32,-983.67 -31.68,-983.98 v1(0,-983.98)
DDR3_BA1: R47.2 U1.R4 U2.N8 U3.N8 | length 2433.1
  Top w4.2: v1(-283.85,-1031.92) -281.92,-1031.92 -264,-1014 -264,-990.7 -243.3,-970 -223.55,-970 U2.N8@-206.5,-952.95 ; U1.R4@141.49,-205.51 v1(157.24,-221.26) ; v1(317.64,-1031.92) 319.58,-1031.92 337.5,-1014 337.5,-990.7 358.2,-970 377.94,-970 U3.N8@394.99,-952.95
  Layer 1 w5: v1(-283.85,-1031.92) -281.77,-1034 -242,-1034 -201.5,-1074.5 -101.5,-1074.5 -58.46,-1031.46 32.2,-1031.46 v1(33,-1030.66) ; v1@33,-1031.46 85.46,-1031.46 94.5,-1040.5 96.27,-1042.27 100.41,-1042.27 100.91,-1041.76 103.04,-1041.76 107.99,-1046.71 107.99,-1048.83 102.83,-1053.99 102.83,-1056.11 107.78,-1061.06 109.91,-1061.06 114.68,-1056.28 116.8,-1056.28 121.75,-1061.23 121.75,-1063.35 117.48,-1067.62 117.48,-1069.75 122.43,-1074.7 124.55,-1074.7 128.69,-1074.69 133,-1079 162,-1079 189,-1079 236.08,-1031.92 v1(317.64,-1031.92) ; v1(103,-484) 104,-484 124,-464 141,-447 141,-325 141,-279.98 153.73,-267.26 163.24,-267.26 171.74,-258.76 171.74,-235.76 v1(157.24,-221.26)
  Layer 2 w5: v1(33,-1030.66) 48.88,-1030.66 64,-1015.54 64,-1013.04 61.07,-1010.11 49.7,-1010.11 47.5,-1007.91 47.5,-1001.31 49.7,-999.11 61.8,-999.11 64,-996.91 64,-990.31 61.8,-988.11 47.06,-988.11 44.86,-985.91 44.86,-979.31 47.06,-977.11 61.8,-977.11 64,-974.91 64,-968.31 61.8,-966.11 49.7,-966.11 47.5,-963.91 47.5,-957.31 49.7,-955.11 61.8,-955.11 64,-952.91 64,-946.31 61.8,-944.11 49.7,-944.11 47.5,-941.91 47.5,-935.31 49.7,-933.11 61.8,-933.11 64,-930.91 64,-924.31 61.8,-922.11 49.7,-922.11 47.5,-919.91 47.5,-913.31 49.7,-911.11 61.8,-911.11 64,-908.91 64,-902.31 61.8,-900.11 56.41,-900.11 54.21,-897.91 54.21,-891.31 56.41,-889.11 61.07,-889.11 64,-886.19 64,-829 64,-797.75 64,-795.25 61.07,-792.32 60.2,-792.32 58,-790.12 58,-783.52 60.2,-781.32 63.53,-781.32 65.73,-779.12 65.73,-772.52 63.53,-770.32 60.2,-770.32 58,-768.12 58,-761.52 60.2,-759.32 65.35,-759.32 67.55,-757.12 67.55,-750.52 65.35,-748.32 60.2,-748.32 58,-746.12 58,-739.52 60.2,-737.32 74.8,-737.32 77,-735.12 77,-728.52 74.8,-726.32 60.2,-726.32 58,-724.12 58,-717.52 60.2,-715.32 74.8,-715.32 77,-713.12 77,-706.52 74.8,-704.32 60.2,-704.32 58,-702.12 58,-695.52 60.2,-693.32 74.8,-693.32 77,-691.12 77,-684.52 74.8,-682.32 60.2,-682.32 58,-680.12 58,-673.52 60.2,-671.32 74.8,-671.32 77,-669.12 77,-662.52 74.8,-660.32 60.2,-660.32 58,-658.12 58,-651.52 60.2,-649.32 74.8,-649.32 77,-647.12 77,-640.52 74.8,-638.32 60.2,-638.32 58,-636.12 58,-629.52 60.2,-627.32 74.8,-627.32 77,-625.12 77,-618.52 74.8,-616.32 60.2,-616.32 58,-614.12 58,-607.52 60.2,-605.32 74.8,-605.32 77,-603.12 77,-596.52 74.8,-594.32 60.2,-594.32 58,-592.12 58,-585.52 60.2,-583.32 74.8,-583.32 77,-581.12 77,-574.52 74.8,-572.32 60.2,-572.32 58,-570.12 58,-563.52 60.2,-561.32 74.8,-561.32 77,-559.12 77,-552.52 74.8,-550.32 60.2,-550.32 58,-548.12 58,-541.52 60.2,-539.32 61.07,-539.32 64,-536.39 64,-523 69.3,-517.7 71.07,-515.93 71.07,-511.79 59.56,-500.27 59.56,-497.16 64.22,-492.49 67.33,-492.49 86,-511.16 89.11,-511.16 93.78,-506.49 93.78,-503.38 90.77,-500.37 90.77,-496.23 94,-493 v1(103,-484)
  Bottom w4.2: v1(33,-1030.66) 61.65,-1030.66 62.45,-1031.46 R47.2@65,-1028.91
DDR3_BA2: R48.2 U1.J5 U2.M3 U3.M3 | length 2343.6
  Top w4.2: U2.M3@-363.98,-921.45 -362.26,-923.18 -346.63,-923.18 v1(-316.85,-952.95) ; v1(-63.19,-190) -63.19,-189.86 -47.49,-174.16 U1.J5@-47.49,-174.02 ; v1(-23.1,-459) -23,-459.1 -23,-484 -39,-500 -39,-510 -39,-612.14 -36.54,-614.6 -27.96,-614.6 -26.58,-615.98 -26.58,-622.42 -27.96,-623.8 -46.62,-623.8 -48,-625.18 -48,-631.62 -46.62,-633 -26.58,-633 -25.2,-634.38 -25.2,-640.82 -26.58,-642.2 -46.62,-642.2 -48,-643.58 -48,-650.02 -46.62,-651.4 -26.58,-651.4 -25.2,-652.78 -25.2,-659.22 -26.58,-660.6 -46.62,-660.6 -48,-661.98 -48,-668.42 -46.62,-669.8 -26.58,-669.8 -25.2,-671.18 -25.2,-677.62 -26.58,-679 -46.62,-679 -48,-680.38 -48,-686.82 -46.62,-688.2 -26.58,-688.2 -25.2,-689.58 -25.2,-696.02 -26.58,-697.4 -46.62,-697.4 -48,-698.78 -48,-705.22 -46.62,-706.6 -26.58,-706.6 -25.2,-707.98 -25.2,-714.42 -26.58,-715.8 -46.62,-715.8 -48,-717.18 -48,-723.62 -46.62,-725 -37.11,-725 -35.73,-726.38 -35.73,-732.82 -37.11,-734.2 -50.42,-734.2 -51.8,-735.58 -51.8,-742.02 -50.42,-743.4 -40.38,-743.4 -39,-744.78 -39,-751.22 -40.38,-752.6 -50.42,-752.6 -51.8,-753.98 -51.8,-760.42 -50.42,-761.8 -40.38,-761.8 -39,-763.18 -39,-769.62 -40.38,-771 -50.42,-771 -51.8,-772.38 -51.8,-778.82 -50.42,-780.2 -40.38,-780.2 -39,-781.58 -39,-788.02 -40.38,-789.4 -50.42,-789.4 -51.8,-790.78 -51.8,-797.22 -50.42,-798.6 -40.38,-798.6 -39,-799.98 -39,-806.42 -40.38,-807.8 -50.42,-807.8 -51.8,-809.18 -51.8,-815.62 -50.42,-817 -40.38,-817 -39,-818.38 -39,-824.82 -40.38,-826.2 -50.42,-826.2 -51.8,-827.58 -51.8,-834.02 -50.42,-835.4 -34.7,-835.4 -33.32,-836.78 -33.32,-843.22 -34.7,-844.6 -50.42,-844.6 -51.8,-845.98 -51.8,-852.42 -50.42,-853.8 -26.58,-853.8 -25.2,-855.18 -25.2,-861.62 -26.58,-863 -50.42,-863 -51.8,-864.38 -51.8,-870.82 -50.42,-872.2 -26.58,-872.2 -25.2,-873.58 -25.2,-880.02 -26.58,-881.4 -50.42,-881.4 -51.8,-882.78 -51.8,-889.22 -50.42,-890.6 -26.58,-890.6 -25.2,-891.98 -25.2,-898.42 -26.58,-899.8 -50.42,-899.8 -51.8,-901.18 -51.8,-907.62 -50.42,-909 -26.58,-909 -25.2,-910.38 -25.2,-916.82 -26.58,-918.2 -50.42,-918.2 -51.8,-919.58 -51.8,-926.02 -50.42,-927.4 -26.58,-927.4 -25.2,-928.78 -25.2,-935.22 -26.58,-936.6 -45.15,-936.6 -46.53,-937.98 -46.53,-944.42 -45.15,-945.8 -24.2,-945.8 -22.1,-947.9 -17.51,-952.49 v1(0,-952.49) ; U3.M3@237.51,-921.45 239.24,-923.18 254.87,-923.18 v1(284.64,-952.95)
  Layer 1 w5: v1(-316.85,-952.95) -231.05,-952.95 -209,-975 -102,-975 -79.49,-952.49 v1(0,-952.49) 106.49,-952.49 112.73,-958.73 129,-975 129.38,-975 132.3,-977.93 132.3,-978.5 133.8,-980 140.8,-980 142.3,-978.5 142.3,-972.5 143.8,-971 150.8,-971 152.3,-972.5 152.3,-978.5 153.8,-980 160.8,-980 162.3,-978.5 162.3,-972.58 163.8,-971.08 170.8,-971.08 172.3,-972.58 172.3,-977.93 173.8,-979.43 180.8,-979.43 182.3,-977.93 185.23,-975 197,-975 219.05,-952.95 v1(284.64,-952.95) ; v1(-63.19,-190) -63.47,-190 -79,-205.53 -79,-403 -23.1,-458.9 v1(-23.1,-459)
  Bottom w4.2: R48.2@-32,-952.5 v1(0,-952.49)